# Altium PCB PCB.PcbDoc (part 7 of 9)
Units mil, origin at the board's own origin, x right, y up, seen from the top; angles counter-clockwise.
Board outline 4330.71 x 3149.61 mil, 8 copper layers (L1_TOP, L2_GND, L3_SIG, L4_PWR, L5_PWR, L6_SIG, L7_GND, L8_BOT), stack 62.406 mil thick; 660 components, 433 nets, 2602 pads, 1254 vias.
Unrouted connection lines stored in the file: 930.
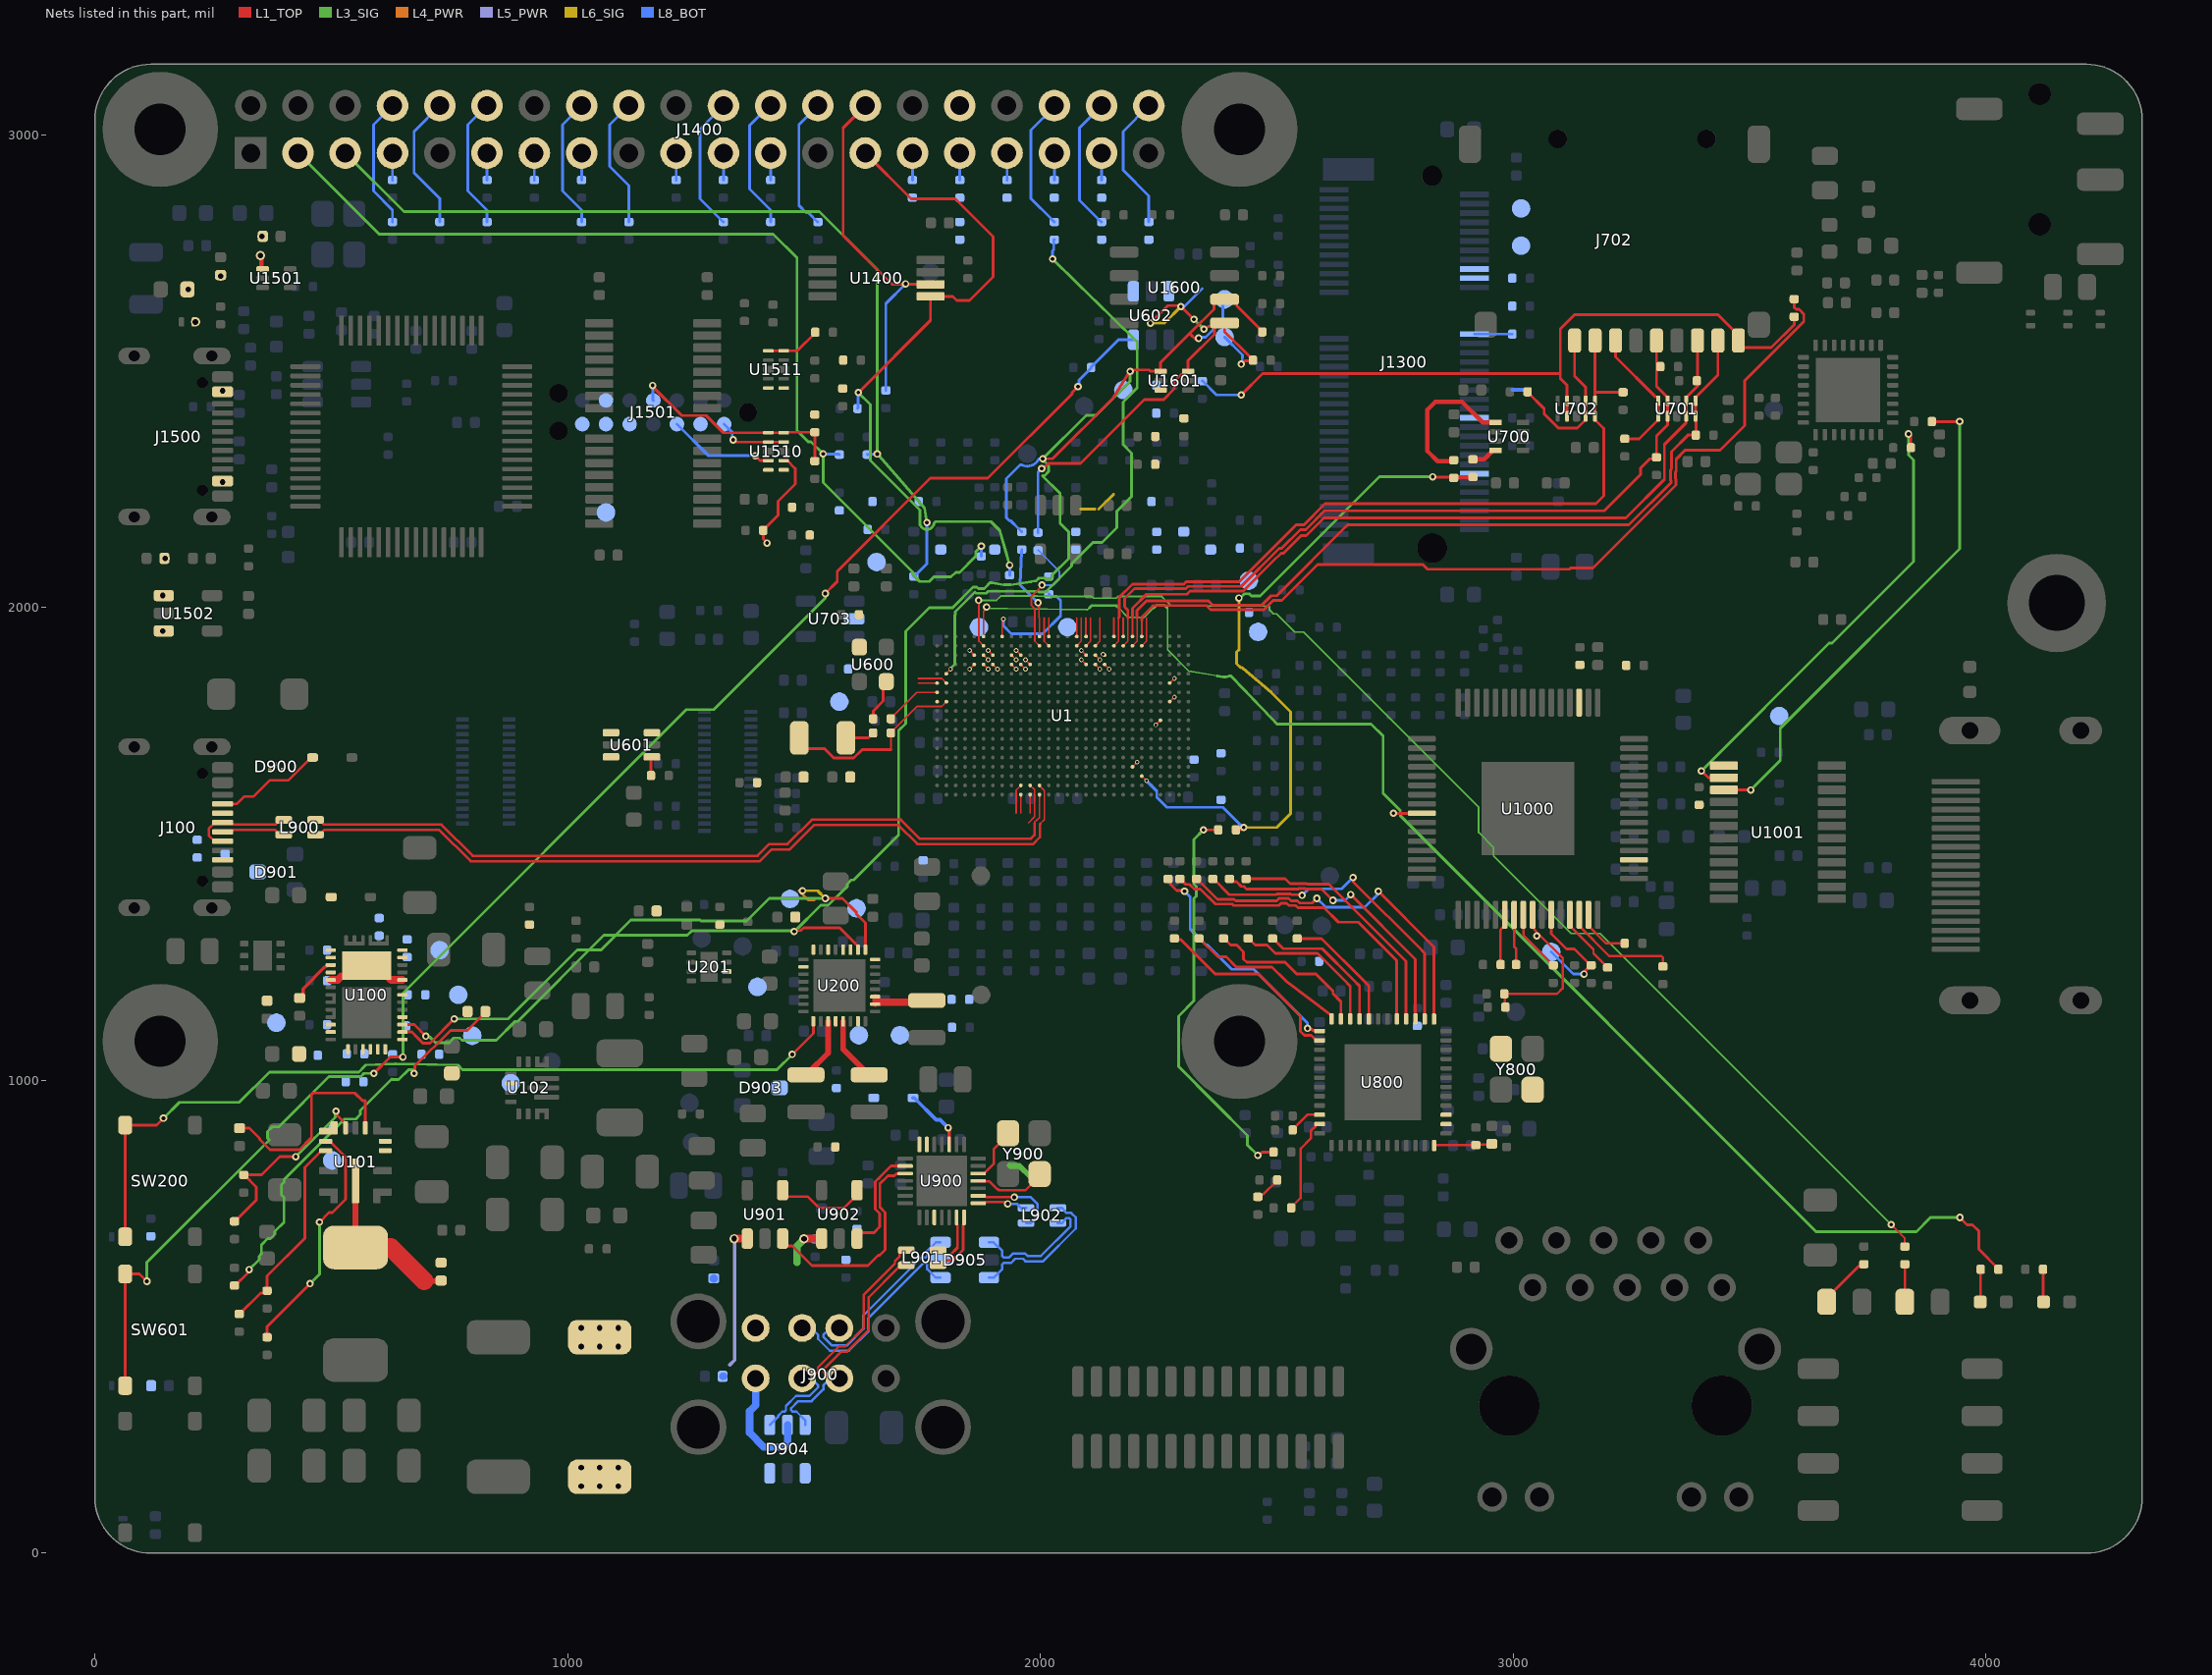
[diagram p10: the nets of this part, all layers, seen from the top]

## Via types
v1: diameter 19.68, hole 11.81, L1_TOP to L8_BOT, 865 vias
v2: diameter 9.84, hole 5.91, L1_TOP to L8_BOT, 246 vias
v3: diameter 15.75, hole 7.87, L1_TOP to L8_BOT, 125 vias
v4: diameter 13.78, hole 7.87, L1_TOP to L8_BOT, 18 vias

## Nets (pads, with @x,y where several pads share a name; then routed paths per layer and width w, separated by ;. In a path a pad name is that pad's centre, name@x,y a point inside that pad or via, vN(x,y) a via of type N, cw(c..) or ccw(c..) an arc to the next point about the centre after c; other vN are vias at no path point) (continued)
HDR28_ID_SC: C1403.1 R1427.1 U1.A8 | length 258.7
  L1_TOP w3.54: U1.A8@1919.29,1938.98 1919.29,1971.91 1921.66,1974.28 v2(1921.66,1975.98)
  L8_BOT w5.91: v2(1921.66,1975.98) 1921.66,1962.03 1938.69,1945 2005,1945 2042.75,1982.75 2042.75,2000 2042.75,2015.22 2034.42,2023.55 2022.71,2023.55 R1427.1@2017.72,2028.54
HDR29_GPIO5: R1407.1 U1.K25 | length 13.9
  L1_TOP w3.54: v2(2244.09,1751.97) U1.K25@2253.94,1761.81
HDR31_GPIO6: R1408.1 U1.H26 | length 13.9
  L1_TOP w3.54: U1.H26@2273.62,1801.18 v2(2283.46,1811.02)
HDR32_GPIO12_PWM0: R1420.1 U1.A17 | length 39.4
  L1_TOP w3.54: U1.A17@2096.46,1938.98 2096.46,1978.35
HDR33_GPIO13_PWM1: R1409.1 U1.B17 | length 63.1
  L1_TOP w3.54: U1.B17@2096.46,1919.29 2106.3,1929.13 2106.3,1978.35
HDR35_GPIO19_PCM_FS: R1410.1 U1.B18 | length 63.1
  L1_TOP w3.54: U1.B18@2116.14,1919.29 2125.98,1929.13 2125.98,1978.35
HDR36_GPIO16: R1421.1 U1.E2 | length 1279.5
  L1_TOP w3.54: U1.E2@1801.18,1860.24 1801.18,1860.71 1810,1869.53 v2(1810,1870)
  L3_SIG w5.91: v2(1810,1870) 1810,1871.07 1819.1,1880.17 1819.1,1984.1 1820,1985 1820,1991.61 1828.39,2000 1861.74,2033.35 1861.85,2033.35 1864.81,2030.39 1885.19,2030.39 1889.53,2034.73 1996.21,2033.78 1997.02,2032.98 2009.25,2032.98 2010.06,2033.78 2012.95,2034.76 2014.18,2035.99 2066.37,2088.18 2066.37,2092.78 2091.69,2118.11 2111.18,2137.6 2130.55,2137.6 2161.73,2168.78 2161.73,2203.9 2192.91,2235.08 2192.91,2327.12 2175,2345.04 2175,2435 2204.76,2464.76 2204.76,2562.35 2201.3,2565.81 v3(2025.77,2737.63)
  L8_BOT w5.91: v3(2025.77,2737.63) 2025.77,2754.84 2028.24,2757.32 2028.24,2777.26 R1421.1@2029.53,2778.54
HDR37_GPIO26: R1411.1 U1.F26 | length 13.9
  L1_TOP w3.54: U1.F26@2273.62,1840.55 v2(2283.46,1850.39)
HDR38_GPIO20_PCM_DIN: R1422.1 U1.A16 | length 39.4
  L1_TOP w3.54: U1.A16@2076.77,1938.98 2076.77,1978.35
HDR40_GPIO21_PCM_DOUT: R1423.1 U1.B16 | length 63.1
  L1_TOP w3.54: U1.B16@2076.77,1919.29 2086.61,1929.13 2086.61,1978.35
HUB_P1_DM: L901.4 U900.6 | length 116.9
  L1_TOP w5.91: L901.4@1783.46,640.75 1792.77,640.75 1797.62,635.9 1797.62,635.02 1801.69,630.95 1809.48,630.95 1824.76,646.23 1824.76,693.95 1823.82,694.88 1823.82,709.15 U900.6@1822.84,710.14
HUB_P1_DP: L901.1 U900.7 | length 136.6
  L1_TOP w5.91: L901.1@1783.46,609.25 1792.77,609.25 1797.62,614.1 1797.62,614.98 1801.69,619.05 1814.41,619.05 1836.66,641.3 1836.66,693.95 1837.6,694.88 1837.6,709.15 U900.7@1838.58,710.14
HUB_P2_DM: L902.4 U900.8 | length 107.5
  L1_TOP w5.12: U900.8@1868.6,740.16 1869.98,741.54 1884.35,741.54 1885.28,742.47 1892.52,742.47 1927.47,742.47 v3(1931,738.94)
  L8_BOT w5.12: v3(1931,738.94) 1931.45,738.49 1950.92,738.49 1959.41,730 L902.4@1970,730
HUB_P2_DP: L902.1 U900.9 | length 188.8
  L1_TOP w5.12: U900.9@1868.6,755.91 1869.98,754.53 1884.35,754.53 1885.28,753.59 1897.13,753.59 1901.06,753.59 1901.79,752.86 1924.6,752.86 1925.05,753.31 1936.95,753.31 1937.4,752.86 v3(1944.92,752.86)
  L8_BOT w5.12: v3(1944.92,752.86) 1979.61,752.86 1994.21,738.26 1994.21,712.87 1979.84,698.5 L902.1@1970,698.5
HUB_PGANG: R907.1 U900.3
HUB_RESET_N: D902.1 U900.17 | length 136.8
  L1_TOP w7.87: v3(1805,900) 1805,897.87 1807.09,895.78 U900.17@1807.09,864.67
  L8_BOT w7.87: D902.1@1730.51,963.07 1733.27,963.07 1779.83,916.51 1788.1,916.51 1804.61,900 v3(1805,900)
HUB_XI: U900.11 Y900.1 | length 154.5
  L1_TOP w5.12: U900.11@1868.6,787.4 1869.98,786.02 1892.52,786.02 1908.54,770 1910,770 1912.36,767.64 1968.35,767.64 1998.46,797.76 Y900.1@1998.46,801.69
HUB_XO: U900.12 Y900.3 | length 173.9
  L1_TOP w5.12: U900.12@1868.6,803.15 1869.98,804.53 1882.44,804.53 1901.28,823.37 1901.28,854.12 1931.54,884.37 Y900.3@1931.54,888.31
  L3_SIG w12: 1935,820 1935.72,819.28 1955.72,819.28 1980,795
I2C0_SCL: R1620.1 U1.A12 | length 206.2
  L1_TOP w3.54: 1996.85,2000 1996.85,1979.44 1998.03,1978.26 U1.A12@1998.03,1938.98
  L1_TOP w5.91: v3(1995,2010.34) 1996.85,2008.49 1996.85,2000
  L8_BOT w5.91: R1620.1@1960.63,2123.03 1960.44,2118.6 1960.41,2118.11 1957.45,2050.6 1957.45,2047.89 1959.18,2046.16 1980.45,2024.89 1992.67,2012.67 v3@1995,2012.67 ; v3(1995,2010.34) v3@1997.33,2012.67 ; v3@1997.45,2012.67 v3@1999.55,2010.57
I2C0_SCL_BUS: R1605.2 R1620.2 TP1601.1 U100.9 U200.10 U1600.6 U1601.1 | length 3822.8
  L1_TOP w5.91: U100.9@650.59,1118.11 675.39,1118.11 v3(700,1093.5) ; v3(1479.33,1315) 1481.21,1316.88 1493.06,1316.88 1499.02,1322.84 1575.52,1322.84 1609.25,1289.1 1609.25,1288.39 1614.17,1283.46 U200.10@1614.17,1276.57 ; v3(2005,2315) 2025.79,2315 2088.56,2377.77 2088.65,2377.77 2150.44,2439.56 2152.44,2441.57 2152.44,2442.06 2188.42,2498.42 v3(2190,2500) 2191.88,2501.88 2197.31,2501.88 2198.38,2502.95 2229.77,2502.95 2232.72,2500 U1601.1@2254.33,2500 2254.33,2518.39 2317.97,2582.03 ; U1601.1@2261.61,2500 U1601.1@2264.57,2502.95 ; v3(2335,2570) 2333.12,2568.12 2327.59,2568.12 2317.97,2577.74 2317.97,2582.03 ; R1605.2@2469.49,2583.27 2469.49,2584.25 2415.5,2638.24 2415.5,2643.53 2406.87,2652.16 U1600.6@2389.76,2652.16 2376.07,2652.16 2367.43,2643.53 2367.43,2631.5 2317.97,2582.03
  L3_SIG w5.91: v3(700,1093.5) 701.88,1091.62 708.38,1091.62 720,1080 750.24,1080 750.24,1081.12 758.88,1089.76 771.12,1089.76 776.04,1084.84 848.78,1084.84 888.94,1125 894.53,1125 1076.81,1307.28 1253.39,1307.28 1262.84,1316.73 1477.6,1316.73 v3(1479.33,1315) ; v3@1479.67,1315.33 1480,1315 1535.24,1370.24 1551.12,1370.24 1591.41,1410.53 1591.41,1415.45 1600.06,1424.1 1604.98,1424.1 1700,1519.12 1700,1740 1715,1755 1715,1950 1765,2000 1814.47,2000 1857.66,2043.19 1865.93,2043.19 1868.88,2040.24 1881.12,2040.24 1889.76,2048.88 1889.76,2049.25 1893.22,2052.71 1898.12,2052.71 1923.07,2048.27 1936.93,2048.27 1980.49,2055.17 1981.1,2055.21 1991.12,2056.6 1997.02,2062.5 2009.25,2062.5 2010.67,2062.01 2012.12,2060.56 2012.68,2060 2020.88,2060 2025.63,2064.75 2025.63,2069.75 2059.76,2103.88 2059.76,2118.11 2059.76,2160.3 2041.87,2178.19 2041.87,2241.52 2005,2278.39 2005,2279.45 2008.98,2279.45 2017.63,2288.1 2017.63,2300.33 2008.98,2308.98 2005,2308.98 v3(2005,2315) 2097.06,2407.06 2117.94,2407.06 2190,2479.12 v3(2190,2500)
  L8_BOT w5.91: R1620.2@1960.63,2160.43 1960.44,2160.43 1953.74,2167.14 1953.74,2167.32 1937.01,2184.06 1934.49,2184.06 1928.15,2190.4 1928.15,2273.15 1956.95,2301.95 1959.39,2301.95 1960.7,2301.95 ccw(c1972.44,2325.79) 1994.21,2310.54 1996.1,2313.24 ; 1996.13,2313.27 1997.86,2315 v3(2005,2315) ; v3(2335,2570) 2336.88,2571.88 2349.58,2571.88 2385.96,2608.26 2385.96,2648.36 TP1601.1@2389.76,2652.16
I2C0_SDA: R1621.1 U1.B12 | length 267
  L1_TOP w3.54: 1985.88,2000 1988.19,1997.69 1988.19,1929.13 U1.B12@1998.03,1919.29
  L1_TOP w3.94: 1985.85,2000 1981.22,2004.63 1981.22,2023.91 2003.14,2045.83 v3(2003.14,2047.74)
  L8_BOT w3.94: R1621.1@1995,2121.3 1995.98,2121.3 2040,2077.28 2040,2060 2027.74,2047.74 v3(2003.14,2047.74)
I2C0_SDA_BUS: R1606.2 R1621.2 TP1602.1 U100.8 U200.9 U1600.5 U1601.6 | length 2556.1
  L1_TOP w5.91: U100.8@650.59,1102.36 670.28,1102.36 682.08,1090.56 693.88,1078.74 708.74,1078.74 v3(760,1130) ; v3(1545,1385) 1581.22,1385 1610.9,1355.31 1610.9,1351.95 1630,1332.86 1630,1276.65 U200.9@1629.92,1276.57 ; v3(2002.86,2294.21) 2005.09,2294.21 2016.04,2305.16 2085.16,2305.16 2220,2440 2260.81,2440 2283.46,2462.66 2283.46,2478.29 2298.29,2493.11 2298.43,2493.11 2305.32,2500 U1601.6@2312.6,2500 2312.6,2522.53 2368.11,2578.04 U1600.5@2368.11,2593.53 ; v3(2232.65,2602.05) 2269.54,2638.94 2288.91,2638.94 ; 2288.93,2638.93 v3@2297.3,2638.93 ; v3(2297.3,2637.05) 2297.62,2637.05 2324.67,2610 v3(2325,2610) ; v3(2345.91,2589.09) 2348.57,2589.09 2354.61,2595.13 U1600.5@2369.71,2595.13 ; U1600.5@2395.52,2596.41 U1600.5@2389.76,2602.16 2389.76,2583.46 2416.79,2556.43 2417.78,2556.43 2449.8,2524.41 2449.8,2522.44 2433.01,2522.44 2425.57,2515 v3(2425,2515)
  L3_SIG w5.91: v3(760,1130) 874.19,1130 1020.45,1276.26 1070.64,1276.26 1133.64,1339.25 1280.01,1339.25 1281.98,1337.28 1378.42,1337.28 1426.14,1385 v3(1545,1385) ; v3(2325,2610) v3(2345.91,2589.09)
  L4_PWR w5.91: v3@1489.47,1401.26 1508.68,1382.05 1522.3,1382.05
  L6_SIG w5.91: v3(1496.78,1401.17) 1528.83,1401.17 v3(1545,1385) ; 2084.73,2208.54 2114.85,2208.27 ccw(c2115,2225) 2115.55,2208.28 ; 2123.47,2208.54 2125.2,2210.27 2154.92,2239.98 ; v3(2232.65,2602.05) 2262.3,2602.05 v3(2297.3,2637.05)
  L8_BOT w5.91: R1621.2@1995,2158.7 1995,2286.35 v3(2002.86,2294.21) ; v3@2300.86,2633.48 2342.3,2674.92 ; TP1602.1@2389.76,2572.64 2427.72,2534.69 2427.72,2528.78 2426.88,2527.95 2426.88,2516.88 v3(2425,2515)
I2C1_SCL: R1100.2 R1102.1 U1.A13 U1001.2 | length 1031
  L1_TOP w3.54: U1.A13@2017.72,1938.98 2017.72,1978.35
  L1_TOP w5.91: v3(3398.35,1654.66) 3412.86,1640.16 U1001.2@3445.83,1640.16 ; v3(3836.56,2367.5) 3841.39,2362.66 R1102.1@3841.39,2338.37
  L3_SIG w5.91: v3(3398.35,1654.66) 3668.69,1925 3675,1925 3847.4,2097.4 3847.4,2312.26 3836.56,2323.1 v3(3836.56,2367.5)
I2C1_SDA: R1101.2 R1103.1 U1.B13 U1001.3 | length 1142
  L1_TOP w3.54: 2007.87,1978.35 2007.87,1929.13 U1.B13@2017.72,1919.29
  L1_TOP w5.91: U1001.3@3445.83,1614.57 3445.95,1614.44 3502.67,1614.44 v3(3502.79,1614.32) ; R1103.1@3885.69,2393.6 3944.19,2393.6 v3(3944.61,2394.02)
  L3_SIG w5.91: v3(3502.79,1614.32) 3565,1676.52 3565,1745 3944.61,2124.61 v3(3944.61,2394.02)
J_HDR3: J1400.3 R1424.2 R1428.2 | length 2166
  L3_SIG w5.91: J1400.3@429.53,2961.81 601.34,2790 1435,2790 1485,2740 1485,2375 1508.87,2351.13 1514.65,2351.13 v3(1540.41,2325.37) 1540.41,2264.59 1730.39,2074.61 1730.39,2069.81 1744.81,2055.39 1765.19,2055.39 1774.77,2064.97 1810.92,2064.97 1820.8,2074.84 1829.5,2074.84 1863.19,2108.53 1863.19,2118.15 v3(1875,2130)
  L8_BOT w5.91: v3(1540.41,2325.37) 1541.18,2324.59 1574.03,2324.59 R1428.2@1574.8,2323.82 ; R1424.2@1875,2108.7 v3(1875,2130)
J_HDR5: J1400.5 R1425.2 R1429.2 | length 1948.4
  L3_SIG w5.91: J1400.5@529.53,2961.81 653.77,2837.57 1532.43,2837.57 1655,2715 v3(1655,2325) 1658.46,2321.54 1755,2210.69 v3(1760,2180)
  L8_BOT w5.91: R1429.2@1633.86,2323.82 1634.45,2324.41 1654.41,2324.41 v3(1655,2325) ; R1425.2@1732.28,2065.94 1733.27,2065.94 1760,2092.68 1760,2118.11 v3(1760,2180)
J_HDR7: J1400.7 R1400.2 | length 57.3
  L8_BOT w5.91: R1400.2@629.53,2904.53 J1400.7@629.53,2961.81
J_HDR8: J1400.8 R1412.2 | length 279.3
  L8_BOT w5.91: R1412.2@629.53,2815.94 629.53,2841.28 589.17,2881.63 589.17,3021.46 J1400.8@629.53,3061.81
J_HDR10: J1400.10 R1413.2 | length 291
  L8_BOT w5.91: R1413.2@729.53,2815.94 729.53,2865.47 675,2920 675,3007.28 J1400.10@729.53,3061.81
J_HDR11: J1400.11 R1401.2 | length 57.3
  L8_BOT w5.91: R1401.2@829.53,2904.53 J1400.11@829.53,2961.81
J_HDR12: J1400.12 R1414.2 | length 279.3
  L8_BOT w5.91: R1414.2@829.53,2815.94 829.53,2841.28 789.17,2881.63 789.17,3021.46 J1400.12@829.53,3061.81
J_HDR13: J1400.13 R1402.2 | length 57.3
  L8_BOT w5.91: R1402.2@929.53,2904.53 J1400.13@929.53,2961.81
J_HDR15: J1400.15 R1403.2 | length 57.3
  L8_BOT w5.91: R1403.2@1029.53,2904.53 J1400.15@1029.53,2961.81
J_HDR16: J1400.16 R1415.2 | length 279.3
  L8_BOT w5.91: R1415.2@1029.53,2815.94 1029.53,2841.28 989.17,2881.63 989.17,3021.46 J1400.16@1029.53,3061.81
J_HDR18: J1400.18 R1416.2 | length 279.3
  L8_BOT w5.91: R1416.2@1129.53,2815.94 1129.53,2893.16 1089.17,2933.52 1089.17,3021.46 J1400.18@1129.53,3061.81
J_HDR19: J1400.19 R1404.2 | length 57.3
  L8_BOT w5.91: R1404.2@1229.53,2904.53 J1400.19@1229.53,2961.81
J_HDR21: J1400.21 R1405.2 | length 57.3
  L8_BOT w5.91: R1405.2@1329.53,2904.53 J1400.21@1329.53,2961.81
J_HDR22: J1400.22 R1417.2 | length 287.2
  L8_BOT w5.91: R1417.2@1329.53,2815.94 1329.06,2815.94 1280,2865 1280,3012.28 J1400.22@1329.53,3061.81
J_HDR23: J1400.23 R1406.2 | length 57.3
  L8_BOT w5.91: R1406.2@1429.53,2904.53 J1400.23@1429.53,2961.81
J_HDR24: J1400.24 R1418.2 | length 284.3
  L8_BOT w5.91: R1418.2@1429.53,2815.94 1429.53,2841.28 1385,2885.8 1385,3020 1426.81,3061.81 J1400.24@1429.53,3061.81
J_HDR26: J1400.26 R1419.2 | length 282.5
  L8_BOT w5.91: R1419.2@1529.53,2815.94 1528.54,2815.94 1509.02,2835.47 1504.53,2835.47 1489.17,2850.83 1489.17,3021.46 J1400.26@1529.53,3061.81
J_HDR27: J1400.27 R1426.2 R1430.2 U1400.5 | length 1507
  L1_TOP w5.91: v3(1615,2455) 1767.72,2607.72 U1400.5@1767.72,2658.46 1814.96,2658.46 1823.42,2650 1850,2650 1900,2700 1900,2785 1820,2865 1726.34,2865 J1400.27@1629.53,2961.81
  L3_SIG w5.91: v3(1615,2455) 1640.24,2429.76 1640.24,2311.53 1745.16,2206.61 1745.16,2178.1 ccw(c1751.06,2178.15) 1745.16,2178 1745.24,2174.85 1745.78,2174.39 cw(c1741.99,2169.86) 1747.13,2172.76 ccw(c1760,2180) 1773.84,2174.87 1774.76,2175.79 1774.76,2178.51 1778.22,2181.97 1895.43,2181.97 1914.07,2163.33 1926.98,2118.11 v3(1935,2090)
  L8_BOT w5.91: R1430.2@1613.19,2421.26 1614.09,2422.17 1614.09,2454.09 v3(1615,2455) ; R1426.2@1935,2068.7 v3(1935,2090)
J_HDR28: J1400.28 R1427.2 R1431.2 U1400.6 | length 764.3
  L1_TOP w5.91: J1400.28@1629.53,3061.81 1582.72,3015 1582.72,2787.28 1685.95,2684.05 U1400.6@1767.72,2684.05
  L8_BOT w5.91: R1431.2@1673.23,2459.65 1673.23,2643.23 v3(1715,2685)
J_HDR29: J1400.29 R1407.2 | length 57.3
  L8_BOT w5.91: R1407.2@1729.53,2904.53 J1400.29@1729.53,2961.81
J_HDR31: J1400.31 R1408.2 | length 57.3
  L8_BOT w5.91: R1408.2@1829.53,2904.53 J1400.31@1829.53,2961.81
J_HDR32: J1400.32 R1420.2
J_HDR33: J1400.33 R1409.2 | length 57.3
  L8_BOT w5.91: R1409.2@1929.53,2904.53 J1400.33@1929.53,2961.81
J_HDR35: J1400.35 R1410.2 | length 57.3
  L8_BOT w5.91: R1410.2@2029.53,2904.53 J1400.35@2029.53,2961.81
J_HDR36: J1400.36 R1421.2 | length 287
  L8_BOT w5.91: R1421.2@2029.53,2815.94 2029.34,2815.94 2023.55,2821.74 2023.55,2821.92 1980,2865.47 1980,3010 2029.53,3059.53 J1400.36@2029.53,3061.81
J_HDR37: J1400.37 R1411.2 | length 57.3
  L8_BOT w5.91: R1411.2@2129.53,2904.53 J1400.37@2129.53,2961.81
J_HDR38: J1400.38 R1422.2 | length 285.2
  L8_BOT w5.91: R1422.2@2129.53,2815.94 2128.54,2815.94 2082.72,2861.77 2082.72,3015 J1400.38@2129.53,3061.81
J_HDR40: J1400.40 R1423.2 | length 291
  L8_BOT w5.91: R1423.2@2229.53,2815.94 2229.53,2871.1 2175,2925.63 2175,3007.28 J1400.40@2229.53,3061.81
JTAG_RTCK_TC: J1501.9 R1521.2
JTAG_SRST_N: J1501.6 R604.2 R1529.2 TP1500.1 U601.3 U1511.5 U1511.6
JTAG_TCK: J1501.11 R1521.1 R1523.2 U1.D9 U1510.1 U1510.10 | length 493.1
  L1_TOP w3.54: U1.D9@1938.98,1879.92 v2(1948.82,1870.08)
  L1_TOP w5.94: v3(1180,2470) 1180,2467.77 1241.29,2406.48 1293.09,2406.48 1329.49,2370.08 U1510.1@1424.51,2370.08 U1510.10@1457.38,2370.08 1464.57,2370.08 1465.55,2371.06 R1521.1@1522.95,2371.06 R1523.2@1522.95,2310.04
  L8_BOT w5.94: v3(1180,2470) 1180.55,2469.45 1180.55,2438.94 J1501.11@1181.1,2438.39
JTAG_TDI: J1501.3 R1525.2 U1.D10 U1510.4 U1510.7 | length 459
  L1_TOP w3.54: U1.D10@1958.66,1879.92 v2(1968.5,1870.08)
  L1_TOP w5.94: v3(1396.5,2321.36) 1406.83,2311.02 U1510.4@1424.51,2311.02 ; R1525.2@1413.7,2163.39 1413.7,2144.99 v3(1421.98,2136.71) ; R1525.2@1413.7,2164.37 1445,2195.67 1445,2225 1481.52,2261.52 1481.52,2295 1480.59,2295 1464.57,2311.02 U1510.7@1457.38,2311.02
  L8_BOT w5.94: J1501.3@1231.1,2388.39 1298.13,2321.36 v3(1396.5,2321.36)
JTAG_TDO: R1520.1 U1.D11 | length 13.9
  L1_TOP w3.54: v2(1968.5,1889.76) U1.D11@1978.35,1879.92
JTAG_TDO_TC: J1501.7 R1520.2 U1510.5 U1510.6
JTAG_TMS: J1501.1 R1524.2 U1.C10 U1510.2 U1510.9 | length 164.4
  L1_TOP w3.54: v2(1948.82,1909.45) U1.C10@1958.66,1899.61
  L1_TOP w5.94: v3(1350,2355) 1352.65,2355 1357.26,2350.39 U1510.2@1424.51,2350.39 U1510.9@1457.38,2350.39
  L8_BOT w5.94: J1501.1@1331.1,2388.39 1331.1,2387.92 1348.12,2370.9 1348.12,2356.88 v3(1350,2355)
JTAG_TRSTN: J1501.2 R1528.1 U1.C9 U1511.1 U1511.10 | length 130.2
  L1_TOP w3.54: U1.C9@1938.98,1899.61 v2(1948.82,1889.76)
  L1_TOP w5.91: U1511.1@1424.51,2543.31 U1511.10@1457.38,2543.31 1485.55,2543.31 1523.94,2581.69 R1528.1@1523.94,2582.68
JTAG_VTREF: J1501.5 R1522.2
LED_5V_A: LED1603.1 R1610.2 | length 69.3
  L1_TOP w5.91: R1610.2@4121.06,600.39 4121.55,599.9 4121.55,531.99 LED1603.1@4122.05,531.5
LED_PWR_A: LED1600.1 R1607.2 | length 116.4
  L1_TOP w5.91: LED1600.1@3663.39,531.5 3663.39,539.37 3730.24,606.23 3737.13,606.23 R1607.2@3742.13,611.22
LED_USR1_A: LED1601.1 R1608.2 | length 79.7
  L1_TOP w5.91: LED1601.1@3828.74,531.5 R1608.2@3828.74,611.22
LED_USR2_A: LED1602.1 R1609.2 | length 69.3
  L1_TOP w5.91: LED1602.1@3988.19,531.5 3988.68,531.99 3988.68,599.9 R1609.2@3989.17,600.39
LFOSC_XI: C602.1 R603.1 U1.H1 Y600.1 | length 62.2
  L1_TOP w5.91: Y600.1@1588.58,1724.41 1635.71,1724.41 1640.32,1729.02 1640.51,1729.02 1646.3,1734.81 R603.1@1646.3,1735
LFOSC_XO: C603.1 R603.2 U1.H2 Y600.2 | length 401.7
  L1_TOP w3.94: 1683.7,1700 R603.2@1683.7,1735 ; R603.2@1683.7,1735.98 1738.66,1790.95 1790.94,1790.95 U1.H2@1801.18,1801.18
  L1_TOP w5.91: Y600.2@1490.16,1724.41 1490.16,1717.98 1506.36,1701.77 1543.22,1701.77 1562.91,1682.09 1605.36,1682.09 1623.27,1700 1646.3,1700 1683.7,1700
LM_CBOOT: C115.2 U101.13 U101.14
LM_EN: R113.2 R114.1 U101.7 | length 432.3
  L1_TOP w5.91: R114.1@305.12,505.91 306.1,505.91 350.32,550.12 359.18,550.12 R113.2@364.17,555.12 364.17,586.17 443.9,665.9 443.9,815.95 479.33,851.38 U101.7@488.19,851.38
LM_FB: C116.2 R117.2 R118.1 U101.4 | length 431.2
  L1_TOP w5.91: R118.1@295.28,701.77 296.26,701.77 341.54,747.05 341.54,774.61 315.95,800.2 R117.2@314.96,800.2 352.84,800.2 391.23,838.58 v3(425,838.58) ; v3(510,935) 511.88,933.12 511.88,927.09 530.51,908.46 U101.4@530.51,899.61
  L3_SIG w5.91: v3(425,838.58) 508.12,921.7 508.12,933.12 v3(510,935)
LM_FF: C116.1 R119.2 | length 874.8
  L1_TOP w5.91: R119.2@295.28,565.95 296.26,565.95 324.4,594.08 324.4,597.89 v3(326.28,599.77) ; v3(675,1015) 676.88,1016.88 676.88,1030.63 752.26,1106.01 787.51,1106.01 825.98,1144.49 C116.1@825.98,1145.67
  L3_SIG w5.91: v3(326.28,599.77) 347.44,620.93 347.44,628.19 352.13,632.87 352.13,652.13 365.16,665.16 371.1,665.16 380.91,674.96 380.91,680.91 400,700 400,752.38 394.68,757.69 394.68,779.71 400,785.02 400,790 528.27,918.27 551.93,918.27 561.73,928.07 561.73,936.73 627.66,1002.66 628.8,1001.52 642.66,1001.52 663.78,1022.64 675,1022.64 v3(675,1015)
LM_RT: R115.1 U101.6 | length 510.2
  L1_TOP w5.91: R115.1@364.17,456.69 364.17,479.17 v3(455,570) ; v3(475,700) 495.17,720.17 502.38,720.17 530.53,748.32 530.53,837.58 497.05,871.06 U101.6@488.19,871.06
  L3_SIG w5.91: v3(455,570) 475,590 v3(475,700)
LM_SW: C115.1 L100.1 U101.10 | length 351.5
  L1_TOP w12: L100.1@551.18,646.65 U101.10@551.18,787.4 ; 696.85,575.79 731.5,575.79 C115.1@732.28,576.57
  L1_TOP w39.37: L100.1@551.18,646.65 625.98,646.65 696.85,575.79
LM_VCC: C113.1 U101.2 | length 452.6
  L1_TOP w5.91: C113.1@306.1,898.82 326.77,898.82 348.63,876.96 348.63,875.21 370.5,853.35 432.65,853.35 458.26,878.95 458.26,969.8 461.71,973.26 549.62,973.26 565.95,956.93 571.85,956.93 U101.2@571.85,899.61
LSW_CT: C221.1 U201.6
M2_ALERT_N: J1300.62
M2_SUSCLK_32K: J1300.50 U1.C7 | length 51.3
  L1_TOP w3.54: v2(1889.76,1909.45) U1.C7@1899.61,1899.61
  L8_BOT w7.87: 2998.23,2460.63 3035.63,2460.63
M2_UART_RXD: J1300.32 R1316.2 | length 79.7
  L8_BOT w5.91: J1300.32@2918.5,2578.74 R1316.2@2998.23,2578.74
M2_UART_WAKE_N: J1300.20 R1317.2 TP1300.1
M2_VIO_CFG: J1300.18 R1319.2 TP1301.1
MCU_ERRORN: R613.1 TP605.1 U1.D7 | length 13.9
  L1_TOP w3.54: U1.D7@1899.61,1879.92 v2(1909.45,1870.08)
MCU_PORZ: C605.1 R606.1 TP601.1 U1.D6 U601.4 | length 54.2
  L1_TOP w3.54: U1.D6@1879.92,1879.92 v2(1889.76,1870.08)
  L1_TOP w5.91: R606.1@1176.3,1645 1176.3,1682.4 U601.4@1178.31,1684.41
MCU_RESETSTATZ: TP606.1 U1.C6 | length 13.9
  L1_TOP w3.54: U1.C6@1879.92,1899.61 v2(1889.76,1889.76)
MCU_RESETZ: R610.2 TP602.1 U1.C5 | length 13.9
  L1_TOP w3.54: v2(1850.39,1909.45) U1.C5@1860.24,1899.61
OSC25M_OE: R601.2 U600.1
OSC25M_SRC: R600.1 U600.3 | length 90.1
  L1_TOP w5.91: R600.1@1646.3,1765 1646.3,1781.3 1667.52,1802.52 1667.52,1836.81 U600.3@1674.21,1843.5
OSC_25M: R600.2 U1.G1 | length 121.5
  L1_TOP w3.54: R600.2@1683.7,1765 1683.7,1765.98 1738.58,1820.87 U1.G1@1781.5,1820.87
PD_ADCIN2: R100.2 R101.1 U100.3
PD_ADCIN3: R102.2 R103.1 U100.5
PD_DRAIN: U100.15 U100.30 U100.40 | length 176.4
  L1_TOP w15.75: U100.30@499.02,1212.6 513.58,1212.6 521.26,1220.28 552.56,1220.28 U100.40@574.8,1242.52 596.85,1242.52 626.77,1212.6 U100.15@650.59,1212.6
PD_FAULT_IN_N: R107.2 U100.18
PD_INT_N: R108.2 U1.F1 U100.6 | length 39.4
  L1_TOP w3.54: 1742.13,1840.55 U1.F1@1781.5,1840.55
PD_LDO_1V5: C106.1 U100.4 U100.7
PD_LDO_3V3: C105.1 R100.1 R102.1 R107.1 R109.1 R110.1 R111.1 R112.1 U100.1
PD_RSVD26: R104.1 U100.26
PD_RSVD27: R105.1 U100.27
PD_RSVD36: R106.1 U100.36
PHY_GTX_CLK: R800.2 U800.29 | length 657.9
  L1_TOP w5.94: R800.2@2295,1426.3 2295.98,1426.3 2297.09,1425.2 2307.5,1414.78 2315.64,1414.78 2325.55,1404.88 2338.44,1404.88 2370.2,1373.12 2405.69,1373.12 2408.69,1370.12 2504.02,1370.12 2508.87,1374.97 2521.11,1374.97 2525.96,1370.12 2540.01,1370.12 2544.79,1365.34 2599.66,1365.34 2630.37,1334.63 2672.52,1334.63 2753.94,1253.22 U800.29@2753.94,1129.92
PHY_LED0: R840.1 U800.47 | length 206.7
  L1_TOP w5.12: R840.1@2530.51,730.32 2530.51,731.3 2550.59,751.38 2550.59,855.59 2572.24,877.24 2572.24,893.83 2577.43,899.02 2578.3,899.02 2581.3,902.01 2581.3,905.32 2583.46,907.48 U800.47@2590.55,907.48
PHY_LED1: R822.2 R823.1 R841.1 U800.46 | length 127.1
  L1_TOP w5.12: R841.1@2460,753.7 2465.14,758.85 2471.44,758.85 2500.98,788.39 R823.1@2500.98,789.37 ; R822.2@2533.7,895 2533.7,895.98 2564.88,927.17 U800.46@2590.55,927.17
PHY_RBIAS: C802.1 R812.1 U800.12 | length 123.9
  L1_TOP w5.12: U800.12@2832.68,862.2 2833.66,863.19 R812.1@2921.26,863.19 2922.72,864.65 2953.54,864.65 C802.1@2955,866.1
PHY_RX_CLK: R806.1 U800.32 | length 263.2
  L1_TOP w5.94: R806.1@2543.31,1300.2 2594.8,1300.2 2682.4,1212.6 2694.88,1200.12 U800.32@2694.88,1129.92
PHY_RX_CTRL: R807.1 R820.2 R821.1 U800.38 | length 415.2
  L1_TOP w5.94: R807.1@2283.47,1300.2 2286.21,1297.45 2297.55,1297.45 2370,1225 2461.31,1225 2507.87,1178.43 2550.21,1136.09 2550.21,1103.88 2558.96,1095.14 2572.97,1095.14 2583.46,1084.65 U800.38@2590.55,1084.65
PHY_RX_D0: R808.1 U800.33 | length 295.3
  L1_TOP w5.94: R808.1@2491.34,1300.2 2492.32,1300.2 2513.93,1278.59 2596.41,1278.59 2662.4,1212.6 2675.2,1199.8 U800.33@2675.2,1129.92
PHY_RX_D1: R809.1 U800.34 | length 327.4
  L1_TOP w5.94: R809.1@2439.37,1300.2 2440.55,1300.2 2454.31,1286.43 2479.23,1286.43 2496.94,1268.72 2586.28,1268.72 2642.4,1212.6 2655.51,1199.49 U800.34@2655.51,1129.92
PHY_RX_D2: R810.1 U800.35 | length 352.8
  L1_TOP w5.94: R810.1@2387.4,1300.2 2388.58,1300.2 2402.35,1286.43 2415.4,1286.43 2429.71,1272.13 2429.71,1256.61 2436.56,1249.75 2517.36,1249.75 2542.12,1225 2582.94,1225 2595.34,1212.6 2619.02,1188.92 2619.02,1183.28 2635.83,1166.47 U800.35@2635.83,1129.92
PHY_RX_D3: R811.1 U800.36 | length 349.2
  L1_TOP w5.94: R811.1@2335.43,1300.2 2336.42,1300.2 2375.3,1261.31 2393.15,1261.31 2414.59,1239.88 2490.12,1239.88 2517.38,1212.62 2520.86,1209.14 2614.39,1138.76 U800.36@2616.14,1129.92
PHY_TX_CTRL: R801.2 U800.37 | length 504.1
  L1_TOP w5.94: R801.2@2270,1426.3 2270.19,1426.3 2275.97,1420.52 2275.97,1414.03 2288.22,1401.78 2303.22,1401.78 v3(2305,1400) ; v3(2565,1110) 2566.88,1108.12 2574.5,1108.12 2576.54,1106.09 2588.8,1106.09 U800.37@2590.55,1104.33
  L8_BOT w5.94: v3(2305,1400) 2316.95,1388.05 2316.95,1320.1 2350.61,1286.43 2353.57,1286.43 2405,1235 2451.31,1235 2565,1121.31 v3(2565,1110)
PHY_TX_D0: R802.2 U800.28 | length 532.8
  L1_TOP w5.94: R802.2@2435,1426.3 2517.95,1426.3 2528.19,1416.06 2563.72,1416.06 2564.64,1415.14 2610.28,1415.14 2773.62,1251.8 U800.28@2773.62,1129.92
PHY_TX_D1: R803.2 U800.27 | length 601.5
  L1_TOP w5.94: R803.2@2400,1426.3 2401.77,1426.3 2407.98,1420.09 2415.33,1420.09 2424.89,1410.53 2430.5,1410.53 2436.15,1404.88 2546.08,1404.88 2547.38,1406.18 2559.63,1406.18 2560.93,1404.88 2594.8,1404.88 v3(2618.83,1380.85) ; v3(2656.62,1393.2) 2793.31,1256.51 U800.27@2793.31,1129.92
  L8_BOT w5.94: v3(2618.83,1380.85) 2644.26,1380.85 v3(2656.62,1393.2)
PHY_TX_D2: R804.2 U800.26 | length 690.3
  L1_TOP w5.94: R804.2@2365,1426.3 2365.98,1426.3 2399.41,1392.87 2498.83,1392.87 2500.68,1394.72 2529.29,1394.72 2531.14,1392.87 2552.03,1392.87 v3(2553.5,1391.4) ; v3(2661.4,1429.3) 2661.4,1420.52 2807.27,1274.65 2807.27,1274.56 2812.99,1268.83 U800.26@2812.99,1129.92
  L8_BOT w5.94: v3(2553.5,1391.4) 2567.4,1405.3 2637.4,1405.3 v3(2661.4,1429.3)
PHY_TX_D3: R805.2 U800.25 | length 757.9
  L1_TOP w5.94: R805.2@2330,1426.3 2330.98,1426.3 2374.29,1383 2409.78,1383 2412.78,1380 2499.93,1380 2504.78,1384.85 2525.2,1384.85 2530.05,1380 2544.1,1380 2548.88,1375.22 2575.22,1375.22 v3(2585,1385) ; v3(2715,1400) 2832.68,1282.32 2832.68,1212.6 U800.25@2832.68,1129.92
  L8_BOT w5.94: v3(2585,1385) 2603.93,1366.07 2686.07,1366.07 2715,1395 v3(2715,1400)
PHY_XI: C800.1 U800.15 Y800.1
PHY_XO: C801.1 U800.14 Y800.3
PMIC_INT_N: R202.2 R203.1 U200.11
PMIC_LPM_EN0: R210.2 U1.D5 | length 13.9
  L1_TOP w3.54: v2(1850.39,1870.08) U1.D5@1860.24,1879.92
PMIC_LX_B1: L200.1 U200.2 U200.3 | length 128.6
  L1_TOP w11.81: U200.3@1650.59,1177.16 U200.2@1650.59,1161.42 1654.53,1165.35
  L1_TOP w15.75: 1654.53,1165.35 1756.89,1165.35 L200.1@1759.84,1169.29
PMIC_LX_B2: L201.1 U200.29 | length 136.4
  L1_TOP w11.81: U200.29@1582.68,1125 1582.68,1065.94 1633.86,1014.76 L201.1@1637.8,1011.81
PMIC_LX_B3: L202.1 U200.27 | length 133.1
  L1_TOP w11.81: L202.1@1503.94,1011.81 1507.87,1014.76 1551.18,1058.07 U200.27@1551.18,1125
PMIC_MODE_RESET: R209.2 TP200.1 U200.28
PMIC_NINT: C220.1 R203.2 U1.C17 | length 13.9
  L1_TOP w3.54: v2(2086.61,1909.45) U1.C17@2096.46,1899.61
PMIC_PB_N: D200.1 R200.2 SW200.1 SW200.2 U200.25 | length 1805.9
  L1_TOP w5.91: SW200.1@63.98,669.29 SW200.2@63.98,905.51 130.51,905.51 v3(145,920) ; v3(1475,1055) 1519.68,1099.68 U200.25@1519.68,1125
  L3_SIG w5.91: v3(145,920) 178.74,953.74 305.27,953.74 369.25,1017.72 558.11,1017.72 571.15,1030.75 572.88,1032.48 635.06,1034.97 cw(c635.73,1018.25) 636.05,1034.98 767.76,1032.48 777.6,1022.64 1442.64,1022.64 v3(1475,1055)
PMIC_PGOOD: R201.2 U200.18 U601.1
PMIC_STBY: R208.2 TP201.1 U200.31
PMIC_VDD1P8: C208.1 U200.14
PORZ_MAN_N: R605.2 TP600.1 U601.6
PORZ_OUT: R612.1 TP604.1 U1.D18 | length 13.9
  L1_TOP w3.54: U1.D18@2116.14,1879.92 v2(2125.98,1870.08)
RESET_REQZ: C609.1 R609.2 U1.D17 U602.6 | length 13.9
  L1_TOP w3.54: v2(2086.61,1889.76) U1.D17@2096.46,1879.92
RESETSTATZ: R611.1 R720.1 R815.1 TP603.1 U1.C18 U703.2 | length 864.9
  L1_TOP w3.54: U1.C18@2116.14,1899.61 v2(2125.98,1889.76)
  L1_TOP w5.91: v3(2345,1530) R720.1@2376.3,1530 ; v3(2459.95,841.6) 2462.61,841.6 2469.44,848.42 R815.1@2493.11,848.42
  L3_SIG w5.91: v3(2345,1530) 2324.84,1509.84 2324.84,1425.2 2324.84,1414.96 2329.61,1410.19 2329.61,1389.81 2324.84,1385.04 2324.84,1168.6 2292.32,1136.08 2292.32,1029.27 2367.85,953.74 2367.95,953.74 2438.21,883.49 2438.21,863.34 v3(2459.95,841.6)
SD_CD_N: R730.2 U1.A23 | length 1864.1
  L1_TOP w3.54: U1.A23@2214.57,1938.98 2214.57,1973.18
  L1_TOP w5.91: 2214.57,1973.18 2214.57,1980.2 2234.37,2000 2238.9,2004.53 2351.42,2004.53 2355.95,2000 2360.25,1995.7 2374.02,1995.7 2472.77,1995.7 2492.41,2015.35 2510.35,2015.35 2586.54,2091.54 2809.1,2091.54 2819.2,2081.44 3119.24,2081.44 3121.68,2083.88 3168.88,2083.88 3344.53,2259.53 3344.53,2271.81 3343.27,2273.07 3343.27,2286.93 3345,2288.66 3345,2314.03 3363.77,2332.8 3437.8,2332.8 3490,2385 3490,2480 3615,2605 3615,2620.69 3604.79,2630.91 3598.62,2630.91 3594.69,2634.84 R730.2@3594.69,2652.56
SD_CLK: J702.5 R728.2 R732.1 U1.B21 U701.2 U701.9 | length 1630.5
  L1_TOP w3.54: U1.B21@2175.2,1919.29 2185.04,1929.13 2185.04,1978.35
  L1_TOP w5.91: 2180,2000 2185.04,1994.96 2185.04,1978.35
  L1_TOP w5.94: 2180,2000 2178.17,2001.83 2178.17,2019.34 2198.95,2040.12 2307.78,2040.12 2312.66,2045 2425,2045 2505.12,2125.12 2510.1,2125.12 2550.04,2165.06 2561.24,2165.06 2601.18,2205 3192.72,2205 3269.02,2281.3 3270,2281.3 3270,2295.39 3289.52,2314.91 3300.35,2314.91 R732.1@3303.35,2317.91 3303.35,2363.35 3326.77,2386.77 U701.2@3326.77,2404.82 U701.9@3326.77,2437.7 3326.77,2444.88 3303.35,2468.31 J702.5@3303.35,2564.96
SD_CMD: J702.3 R723.2 U1.A21 U701.1 U701.10 | length 334.3
  L1_TOP w3.54: U1.A21@2175.2,1938.98 2175.2,1978.35
  L1_TOP w5.94: J702.3@3216.73,2564.96 3216.73,2530.46 3301.34,2445.85 3306.12,2445.85 3307.09,2444.88 U701.10@3307.09,2437.7 3307.09,2397.64 3266.73,2357.28 R723.2@3236.42,2357.28
SD_D0: J702.7 R724.2 U1.A22 U701.4 U701.7 | length 1620.7
  L1_TOP w3.54: 2194.74,1978.35 2194.74,1975.26 2194.88,1975.11 U1.A22@2194.88,1938.98
  L1_TOP w5.91: 2194.58,1978.35 2194.58,1998.55 2196.03,2000
  L1_TOP w5.94: 2196.03,2000 2224.53,2028.5 2310.12,2028.5 2316.75,2035.12 2429.09,2035.12 2492.13,2098.16 2509.21,2115.25 2514.2,2115.25 2551.57,2152.62 2562.77,2152.62 2600.15,2190 3238.71,2190 3320.1,2271.39 3320.1,2345.1 3365.67,2390.67 3365.67,2404.35 U701.4@3366.14,2404.82 U701.7@3366.14,2437.7 3366.14,2444.88 3389.96,2468.7 3389.96,2480 J702.7@3389.96,2564.96
SD_D1: J702.8 R725.2 U1.B22 U701.5 U701.6 | length 1680
  L1_TOP w3.54: U1.B22@2194.88,1919.29 2204.72,1929.13 2204.72,1977.66
  L1_TOP w5.91: 2204.03,1977.66 2204.03,1994.03 2210,2000
  L1_TOP w5.94: 2210,2000 2224.39,2014.39 2355.5,2014.39 2364.33,2005.56 2468.68,2005.56 2488.33,2025.21 2492.13,2025.21 2500.21,2025.21 2650,2175 3245,2175 3334.67,2264.67 3334.67,2267.72 3333.41,2268.99 3333.41,2291.01 3334.67,2292.28 3334.67,2294.67 3335,2295 3335,2330 3370,2365 R725.2@3386.3,2365 ; R725.2@3386.79,2366.21 3386.79,2403.86 U701.5@3385.83,2404.82 U701.6@3385.83,2437.7 3385.83,2444.88 3433.27,2492.32 J702.8@3433.27,2564.96
SD_D2: J702.1 R726.2 U1.A20 U702.2 U702.9 | length 384.2
  L1_TOP w3.54: U1.A20@2155.51,1938.98 2155.51,1978.35
  L1_TOP w5.94: R726.2@3030.71,2455.71 3065.67,2420.75 3065.67,2409.97 3095.64,2380 3135.91,2380 3153.54,2397.64 U702.9@3153.54,2404.82 U702.2@3153.54,2437.7 3153.54,2466.46 3130.12,2489.88 J702.1@3130.12,2564.96
SD_D3: J702.2 R727.2 U1.B20 U702.1 U702.10 | length 1616.6
  L1_TOP w3.54: U1.B20@2155.51,1919.29 2165.35,1929.13 2165.35,1978.35
  L1_TOP w5.91: 2165.35,1978.35 2166.93,1979.92 2166.93,2000
  L1_TOP w5.94: 2166.93,2000 2166.93,2022.07 2194.86,2050 2303.69,2050 2308.56,2054.88 2420.91,2054.88 2540.97,2174.94 2557.15,2174.94 2602.21,2220 3175,2220 3191.52,2236.52 3191.52,2380 3190.87,2380 3173.23,2397.64 U702.10@3173.23,2404.82 U702.1@3173.23,2437.7 3173.33,2437.8 3173.33,2455.71 ; J702.2@3173.42,2564.96 3173.33,2564.86 3173.33,2455.71 ; R727.2@3232.48,2455.71 3173.33,2455.71
SD_LSW_ON1: R721.2 U700.1 | length 321.6
  L1_TOP w9.45: R721.2@2874.41,2312.01 2872.4,2310 2840,2310 2818.91,2331.09 2818.91,2418.91 2835,2435 2892.36,2435 2935.63,2391.73 U700.1@2962.99,2391.73
SD_LSW_ON2: R722.2 U700.4 | length 57.2
  L1_TOP w9.45: R722.2@2915,2313.7 2939.02,2313.7 2954.53,2329.21 2954.53,2331.5 2955.71,2332.68 U700.4@2962.99,2332.68
SD_PWR_EN: R720.2 R721.1 R722.1 U1.T23 | length 1514.5
  L1_TOP w3.54: U1.T23@2214.57,1643.7 v2(2224.41,1633.86)
  L1_TOP w5.91: R720.2@2413.7,1530 2423.52,1530 2428.52,1535 v3(2430,1535) ; v3(2829.74,2276.95) 2830.91,2275.78 2873.24,2275.78 R721.1@2874.41,2274.61
  L1_TOP w9.45: R721.1@2874.41,2274.61 2875.26,2275.45 2914.15,2275.45 R722.1@2915,2276.3
  L3_SIG w5.91: v3(2420,2020.34) 2422.66,2020.34 2431.85,2029.53 2441.57,2029.53 2446.1,2025 2465,2025 2716.95,2276.95 v3(2829.74,2276.95)
  L6_SIG w5.91: v3(2420,2020.34) 2420,1910.88 2415.24,1906.12 2415.24,1890 2415.24,1881.68 2423.88,1873.03 2424.95,1873.03 cw(c2424.95,1867.12) 2428.78,1871.63 ; 2428.79,1871.61 2488.69,1820.43 2492.13,1816.99 ; v3(2430,1535) 2492.13,1535 2500,1535 2520.57,1555.58 2529.29,1564.29 2529.29,1779.83 2492.15,1816.97
  L8_BOT w5.91: v2(2224.41,1633.86) 2246.26,1612.01 2246.26,1598.85 2267.35,1577.76 2386.13,1577.76 2428.88,1535 v3(2430,1535)
SD_SOCK_CD_N: J702.9 R730.1 R731.2 U702.4 U702.7 | length 1561.6
  L1_TOP w5.91: v3(2425,2450) 2470,2495 3100,2495 ; U702.7@3114.17,2404.82 U702.4@3114.17,2437.7 3114.17,2470.83 3100,2485 3100,2495 ; R730.1@3594.69,2615.16 3594.69,2598.6 3546.08,2550 3487.1,2550 3476.57,2560.53 3476.57,2576.77 3433.35,2620 3130,2620 3100,2590 3100,2495
  L8_BOT w5.91: R731.2@2342.52,2479.33 2343.5,2479.33 2372.84,2450 v3(2425,2450)
SD_VSEL: R204.2 U1.B23 U200.12 | length 63.1
  L1_TOP w3.54: U1.B23@2214.57,1919.29 2224.41,1929.13 2224.41,1978.35
TFP_BSEL: R1002.2 U1000.15 | length 115.7
  L1_TOP w5.12: U1000.15@3159.45,1350.39 3159.45,1326.77 3196.22,1290 R1002.2@3236.3,1290
TFP_DK1: R1016.2 U1000.8 | length 132.9
  L1_TOP w5.12: U1000.8@3021.65,1350.39 3021.79,1350.26 3021.79,1306.92 R1016.2@3085,1243.7
TFP_DK2: R1015.2 U1000.7 | length 107.2
  L1_TOP w5.12: U1000.7@3001.97,1350.39 3001.97,1283.47 3006.3,1279.13 R1015.2@3006.3,1245
TFP_DK3: R1014.2 U1000.6 | length 109.4
  L1_TOP w5.12: R1014.2@2973.7,1245 2973.7,1318.61 2975,1319.91 2975,1320.43 2978.24,1323.67 2978.97,1323.67 2982.28,1326.98 U1000.6@2982.28,1350.39
TFP_DKEN: R1005.1 R1013.2 U1000.35
TFP_DSEL: R1003.1 U1000.14 | length 247.3
  L1_TOP w5.12: U1000.14@3139.76,1350.39 3139.76,1326.77 3203.46,1263.07 3313.93,1263.07 3316.93,1260.07 R1003.1@3316.93,1241.14
TFP_EDGE: R1004.1 R1012.2 U1000.9 | length 345
  L1_TOP w5.12: R1004.1@2983.7,1155 2982.5,1156.2 2982.5,1181.87 R1012.2@2981.3,1183.07 3093.07,1183.07 3104.67,1194.67 3104.67,1259.06 v3@3054.14,1309.59 ; U1000.9@3041.34,1350.39 3044.44,1347.29 3044.44,1319.29 v3@3054.14,1309.59 ; v3(3050.03,1305.48) v3@3054.14,1309.59
TFP_IDCK: R1000.2 U1000.57 | length 60.4
  L1_TOP w5.94: v3(2746.68,1565.07) 2746.8,1564.96 U1000.57@2807.09,1564.96
TFP_ISEL: R1001.1 U1000.13 | length 144.8
  L1_TOP w5.12: U1000.13@3120.08,1350.39 3120.08,1326.77 3170,1276.85 3170,1268.7 R1001.1@3200,1238.7
TFP_TFADJ: R1008.2 U1000.19
TMP102_ALERT_N: R1604.2 TP1600.1 U1601.3
TP_3V3_PG: R120.2 TP104.1 U101.5
TP_5V0_PG: R125.2 TP105.1 U102.2
TP_HDMI_CEC_A: TP1001.1 U1001.1
TP_HDMI_MSEN: R1007.2 TP1000.1 U1000.11 | length 263.9
  L1_TOP w5.91: U1000.11@3080.71,1350.39 3080.71,1310.63 3113.07,1278.27 3129.45,1278.27 3164.02,1243.7 3164.02,1242.9 3151.88,1230.77 3151.88,1226.88 v3(3150,1225)
  L8_BOT w5.91: TP1000.1@3080.71,1271.65 3127.36,1225 v3(3150,1225)
TP_PD_DBG_ACC: R112.2 TP103.1 U100.10
TP_PD_PLUG_EVT: R110.2 TP101.1 U100.37
TP_PD_PLUG_FLIP: R111.2 TP102.1 U100.13
TP_PD_SINK_EN_N: R109.2 TP100.1 U100.19
TP_PMIC_GPIO: TP203.1 U200.16
TP_PMIC_GPO1: TP202.1 U200.8
USB0_DM: L900.3 U1.U12 | length 1736.7
  L1_TOP w3.54: U1.U12@1998.03,1624.02 1998.03,1623.63 2008.46,1613.2 2008.46,1551.78 2000.64,1543.95 2000.64,1543.31
  L1_TOP w5.34: L900.3@466.54,1519.68 475.69,1519.68 481.58,1525.57 481.58,1526.63 484.71,1529.76 728.51,1529.76 794.61,1463.66 1406.45,1463.66 1431.6,1488.81 1469.85,1488.81 1521.04,1540 1700,1540 1740,1500 1984.7,1500 1999.04,1514.34 1999.04,1541.71 2000.64,1543.31
USB0_DP: L900.2 U1.V12 | length 1694.7
  L1_TOP w3.54: 1987.7,1543.31 1987.7,1546.4 1992.62,1551.33 1993.26,1551.33 1998.03,1556.1 U1.V12@1998.03,1604.33
  L1_TOP w5.34: L900.2@466.54,1551.18 475.69,1551.18 481.58,1545.29 481.58,1544.23 484.71,1541.1 733.2,1541.1 799.31,1475 1401.75,1475 1426.91,1500.15 1465.15,1500.15 1516.34,1551.34 1704.7,1551.34 1744.7,1511.34 1980,1511.34 1987.7,1519.04 1987.7,1543.31
USB0_DRVVBUS: R905.1 U1.C19 | length 4.1
  L1_TOP w3.54: v2(2132.48,1901.47) 2134.34,1899.61 U1.C19@2135.83,1899.61
USB0_VBUS_CLAMP: D901.3 R902.2 R903.1
USB0_VBUS_DIV: R903.2 R904.1 U1.V11 | length 39.4
  L1_TOP w3.54: 1978.35,1564.96 U1.V11@1978.35,1604.33
USB1_DM: U1.U10 U900.20 | length 63.1
  L1_TOP w3.54: 1948.82,1564.96 1948.82,1614.17 U1.U10@1958.66,1624.02
USB1_DP: U1.V10 U900.21 | length 39.4
  L1_TOP w3.54: 1958.66,1564.96 U1.V10@1958.66,1604.33
USB1_DRVVBUS: R913.1 U1.D19 U901.4 U902.4 | length 210.9
  L1_TOP w3.54: U1.D19@2135.83,1879.92 v2(2145.67,1870.08)
  L1_TOP w5.12: U901.4@1454.72,767.72 1454.72,763.52 1463.72,754.53 1507.68,754.53 1532.2,730 1584.33,730 1612.2,757.87 U902.4@1612.2,767.72
USB1_VBUS_CLAMP: D903.3 R910.2 R911.1
USB1_VBUS_DIV: R911.2 R912.1 U1.U11 | length 88.1
  L1_TOP w3.54: 1975,1545 1987.6,1557.6 1987.6,1614.76 U1.U11@1978.35,1624.02
USB_HUB_RST_N: D902.2 R906.1 U1.R22 | length 13.9
  L1_TOP w3.54: U1.R22@2194.88,1663.39 v2(2204.72,1673.23)
USBA1_DM: D904.3 D904.4 J900.2 L901.3 | length 571.7
  L1_TOP w5.12: J900.2@1496.06,369.68 1506.38,380 1525.63,380 1529.87,384.25 1529.87,393.09 1574.27,437.49 1586.86,437.49 1626.09,476.72 1626.09,545.87 1692.32,612.1 1692.32,617.51 1702.64,627.82 1702.64,635.54 1707.85,640.75 L901.3@1716.54,640.75
  L8_BOT w5.12: D904.4@1427.6,271.18 1445.28,288.86 1445.28,290.65 1453.96,299.33 1458.8,299.33 1461.8,302.33 1461.8,311.17 1483.11,332.48 1511.47,332.48 1529.87,350.88 1529.87,355.12 1525.63,359.36 1506.38,359.36 J900.2@1496.06,369.68
USBA1_DP: D904.1 D904.6 J900.3 L901.2 | length 537.2
  L1_TOP w5.12: J900.3@1574.8,369.68 1564.48,380 1545.24,380 1540.99,384.25 1540.99,388.49 1578.87,426.37 1591.46,426.37 1637.2,472.11 1637.2,541.26 1699.88,603.94 1700.63,603.94 1705.95,609.25 L901.2@1716.54,609.25
  L8_BOT w5.12: D904.6@1502.4,271.18 1502.4,281.02 1484.09,299.33 1475.92,299.33 1472.92,302.33 1472.92,306.57 1487.71,321.36 1516.08,321.36 1540.99,346.28 1540.99,355.12 1545.24,359.36 1564.48,359.36 J900.3@1574.8,369.68
USBA1_OC_N: R908.2 U900.24 U901.3 | length 465.3
  L1_TOP w5.91: U901.3@1454.72,665.35 1454.72,658.2 1463.36,649.56 1475.39,649.56 1516.69,608.27 1635.16,608.27 1656.81,629.92 1659.92,629.92 1671.77,641.77 1671.77,720.65 1660.75,731.67 1660.75,781.48 1677.5,798.23 1691.42,798.23 1695.35,802.17 1713.09,802.17 U900.24@1714.08,803.15
USBA2_DM: D905.3 D905.4 J900.6 L902.3 | length 738.6
  L8_BOT w5.12: J900.6@1496.06,476.38 1506.38,466.06 1525.63,466.06 1529.87,461.81 1529.87,452.97 1554.79,428.05 1594.82,428.05 1637.2,470.44 1637.2,498.21 1753.43,614.44 1757.67,614.44 1760.67,611.44 1760.67,600.91 1778.98,582.6 D905.4@1788.82,582.6 ; D905.3@1891.18,582.6 1901.02,582.6 1919.33,600.91 1919.33,610.91 1922.33,613.91 1938.03,613.91 1946.96,622.84 1962.96,622.84 1968.39,617.41 2005.7,617.41 2075,686.71 2075,710.3 2065.49,719.81 2055.09,719.81 2052.09,722.81 2052.09,723.94 2046.03,730 L902.3@2036.93,730
USBA2_DP: D905.1 D905.6 J900.7 L902.2 | length 684.4
  L8_BOT w5.12: J900.7@1574.8,476.38 1564.48,466.06 1545.24,466.06 1540.99,461.81 1540.99,457.57 1559.39,439.17 1590.21,439.17 1626.09,475.05 1626.09,502.82 1748.83,625.56 1757.67,625.56 1760.67,628.56 1760.67,639.09 1778.98,657.4 D905.6@1788.82,657.4 ; D905.1@1891.18,657.4 1901.02,657.4 1919.33,639.09 1919.33,628.03 1922.33,625.03 1933.42,625.03 1942.35,633.96 1967.56,633.96 1970.82,630.71 1973,628.52 2001.09,628.52 2063.88,691.31 2063.88,705.69 2060.88,708.69 2055.09,708.69 2052.09,705.69 2052.09,704.56 2046.03,698.5 L902.2@2036.93,698.5
USBA2_OC_N: R909.2 U900.23 U902.3 | length 237
  L1_TOP w5.91: U902.3@1612.2,665.35 1612.2,669.52 1620.84,678.15 1648.15,678.15 1660,690 1660,718.5 1650.9,727.59 1650.9,785.56 1660,794.65 1660,795 1683.9,818.9 U900.23@1714.08,818.9
USBC1_CC1: C102.1 D101.1 J100.A5 U100.28 | length 333.1
  L1_TOP w5.12: J100.A5@270.08,1584.65 299.82,1584.65 315.41,1600.23 335.23,1600.23 370,1635 409.61,1635 457.68,1683.07 D101.1@460.43,1683.07
  L1_TOP w7: C102.1@433.07,1174.41 433.27,1174.41 440.26,1181.4 440.26,1193.72 486.26,1239.72 487.75,1239.72 492.13,1244.09 U100.28@499.02,1244.09
USBC1_CC2: C103.1 D102.1 J100.B5 U100.29
USBC1_DM: D900.3 J100.A7 J100.B7 L900.4 | length 136.1
  L1_TOP w5.34: J100.A7@270.08,1525.59 273.14,1528.65 291.87,1528.65 292.98,1529.76 381.43,1529.76 384.56,1526.63 384.56,1525.57 390.45,1519.68 L900.4@399.61,1519.68
USBC1_DP: D900.2 J100.A6 J100.B6 L900.1 | length 218.9
  L1_TOP w5.34: J100.B6@270.08,1505.91 253.54,1505.91 241.03,1518.42 241.03,1532.76 253.54,1545.28 J100.A6@270.08,1545.28 273.14,1542.21 291.87,1542.21 292.98,1541.1 381.43,1541.1 384.56,1544.23 384.56,1545.29 390.45,1551.18 L900.1@399.61,1551.18
USER_BTN_N: U1.F2 U602.4 | length 63.1
  L1_TOP w3.54: 1742.13,1850.39 1791.34,1850.39 U1.F2@1801.18,1840.55
USER_LED1: R1608.1 U1.B6 | length 2693.6
  L1_TOP w3.54: 1870.08,2000 1870.08,1929.13 U1.B6@1879.92,1919.29
  L1_TOP w3.94: v3(1869.38,2015.57) 1870.08,2014.87 1870.08,2000 ; v3(3800,695) 3828.74,666.26 R1608.1@3828.74,648.62
  L3_SIG w3.94: v3(1869.38,2015.57) 1907.27,2015.57 1916.63,2024.92 1992.54,2024.92 1993.35,2024.12 2039.42,2024.12 2039.92,2023.62 2109.09,2023.62 2112.72,2020 2160.46,2020 2164.09,2023.62 2257.02,2023.62 2277.1,2003.54 2483.04,2003.54 2484.75,2001.84 2484.75,1994.87 2492.13,1987.49 2492.82,1986.8 2499.78,1986.8 2538.13,1948.45 2556.87,1948.45 2927.17,1578.16 2927.17,1524.24 2958.66,1492.74 2958.66,1474.58 3122.49,1310.75 3184.25,1310.75 v3(3800,695)
USER_LED2: R1609.1 U1.A6 | length 2987.7
  L1_TOP w3.54: U1.A6@1879.92,1938.98 1879.92,1992.36 1886.22,1998.66 v3@1886.22,2000
  L1_TOP w5.91: v3@1886.22,2000 v3(1886.22,2001.33) ; v3(3945,710) 3960.17,694.83 3971.71,694.83 3985,681.54 3985,642.95 4026.57,601.38 R1609.1@4026.57,600.39
  L3_SIG w3.54: v3@1887.2,2000 1889.25,1997.96 1930.67,1997.96 2098.36,1995.65 2099.64,1995.65 2099.87,1995.69 2104.19,2000 ; 2164.77,2000 2185,1979.76 2219.79,1979.76 2240.03,2000 ; 2268.11,2000 2269.09,1999.02 2269.09,1910.91 2312.33,1867.67 2314.06,1865.95 2374.02,1855.75
  L3_SIG w5.91: v3(1886.22,2001.33) v3@1887.2,2000 ; 2104.19,2000 2108.72,2004.53 2160.24,2004.53 2164.77,2000 ; 2240.03,2000 2244.55,2004.53 2263.59,2004.53 2268.11,2000 ; 2374.02,1855.75 2387.19,1853.5 ccw(c2390,1870) 2395.01,1854.04 2399.27,1855.37 2403.18,1855.37 2404.6,1853.95 2492.13,1762.85 2497.37,1757.4 2500.83,1753.94 2503.27,1753.94 2699.73,1753.94 2725.11,1728.55 2725.11,1607.52 2761.45,1571.19 2761.45,1559.89 3641.1,680.24 3853.23,680.24 3882.99,710 v3(3945,710)
USERBTN_SW_N: C607.1 D601.1 R608.2 SW601.1 SW601.2 U602.3 | length 3347.5
  L1_TOP w5.91: SW601.1@63.98,354.33 SW601.2@63.98,590.55 94.45,590.55 v3(110,575) ; v3(590,1015) 624.53,1049.53 v3(651.53,1049.53) ; v3(1545,2030) 1570.32,2055.32 1570.32,2076.95 1766.99,2273.62 1888.62,2273.62 2067.22,2452.22 2067.22,2455.15 v3(2079.67,2467.6)
  L3_SIG w5.91: v3(110,575) 110,615 369.03,874.03 365.16,877.91 365.16,891.77 374.96,901.57 388.82,901.57 495.12,1007.87 562.19,1007.87 569.31,1015 v3(590,1015) ; v3(651.53,1049.53) 651.53,1184.92 1251.06,1784.45 1309.45,1784.45 1545,2020 v3(1545,2030)
  L8_BOT w5.91: v3(2079.67,2467.6) 2081.56,2469.49 2081.56,2481.16 2107.28,2506.89 R608.2@2107.28,2507.87 2107.28,2508.86 2165.35,2566.93 U602.3@2196.85,2566.93
VBUS_DBG: C1500.1 C1501.1 C1502.1 C1503.1 D1500.1 J1500.A4B9 J1500.B4A9 U1501.1 U1502.1 U1502.3 | length 49.1
  L1_TOP w9.45: D1500.1@210.63,2604.33 v1(212.6,2604.33) ; v1(350,2745) 351.96,2743.04 351.96,2717.72 353.14,2716.53 U1501.1@354.72,2716.53
  L1_TOP w15.75: v1(143.7,1950.79) U1502.3@145.67,1950.79 ; v1(143.7,2025.59) U1502.1@145.67,2025.59 ; C1503.1@146.85,2104.33 v1(148.82,2104.33) ; C1500.1@195.67,2673.23 v1(197.64,2673.23) ; v1(265.75,2701.57) C1501.1@265.75,2703.54 ; v1(270.08,2265.75) J1500.B4A9@270.08,2267.72 ; J1500.A4B9@270.08,2456.69 v1(270.08,2458.66) ; v1(353.15,2785.43) C1502.1@355.12,2785.43
VBUS_USBA1: C907.1 C908.1 D904.5 J900.1 U901.1 | length 552.5
  L1_TOP w15.75: v1(1352.36,665.35) U901.1@1379.92,665.35
  L5_PWR w7.87: 1343.5,398.62 1353.35,408.46 v1@1353.35,664.37
  L8_BOT w15.75: C908.1@1327.95,374.02 C908.1@1329.92,374.02 ; J900.1@1397.64,369.68 1397.64,312.8 1385,300.16 1385,255 1415,225 1455.78,225 1465,234.22 D904.5@1465,271.18
  other v1: 1028.54,141.73 1067.91,141.73 1107.28,141.73 1028.54,181.1 1067.91,181.1 1107.28,181.1
VBUS_USBA2: C911.1 C912.1 D905.5 J900.5 U902.1 | length 95.7
  L1_TOP w15.75: v1(1500,665) 1500.35,665.35 U902.1@1537.4,665.35
  L3_SIG w15.75: 1485,615 1485,648.93 1500,663.93 v1(1500,665)
  L8_BOT w15.75: C912.1@1309.06,579.53 C912.1@1309.05,581.5
  other v1: 1028.54,437.01 1067.91,437.01 1107.28,437.01 1028.54,476.38 1067.91,476.38 1107.28,476.38